# Altium PCB PCB1.pcbdoc (part 3 of 3)
Units mm, origin at the board's own origin, x right, y up, seen from the top; angles counter-clockwise.
Board outline 135 x 100 mm, 4 copper layers (Top Layer, GND, VCC, Bottom Layer), stack 1.757 mm thick; 175 components, 160 nets, 705 pads, 758 vias.
Unrouted connection lines stored in the file: 8.
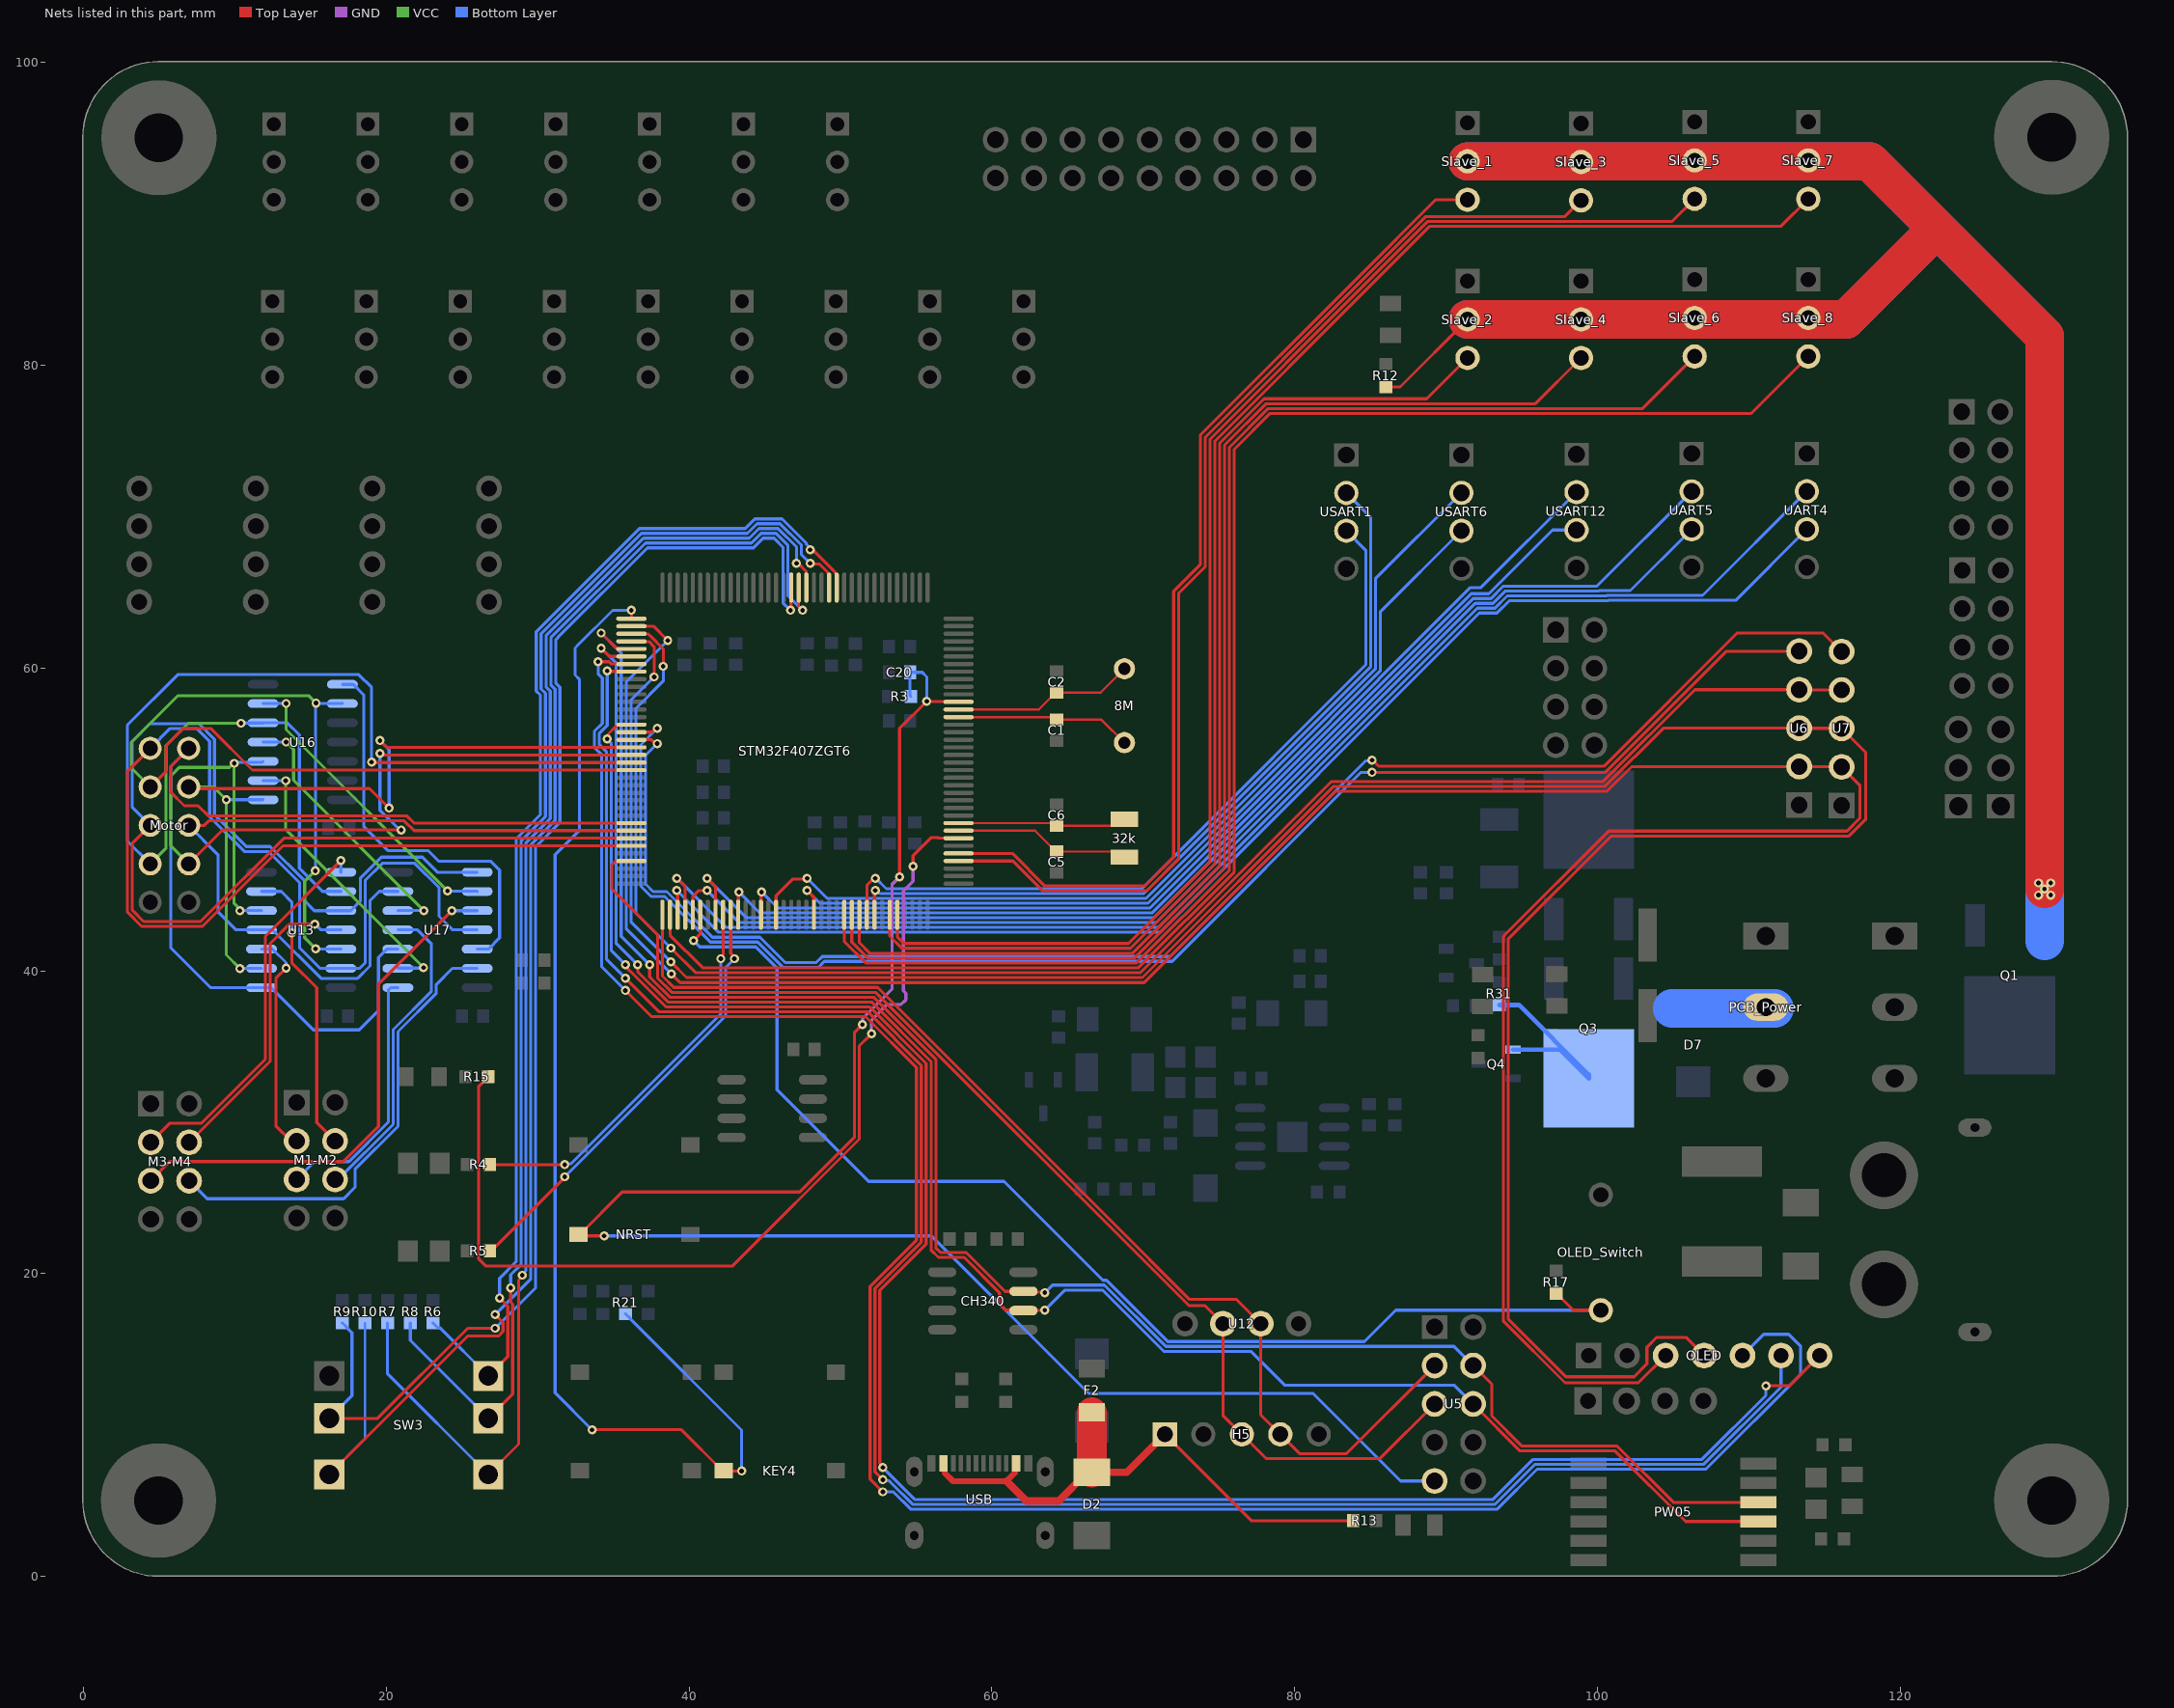
[diagram p5: the nets of this part, all layers, seen from the top]

## Via types
v1: diameter 0.6, hole 0.3, Top Layer to Bottom Layer, tented both sides, 722 vias
v2: diameter 0.6, hole 0.5, Top Layer to Bottom Layer, tented both sides, 24 vias
v3: diameter 0.6, hole 0.5, Top Layer to Bottom Layer, 8 vias
v4: diameter 0.61, hole 0.305, Top Layer to Bottom Layer, tented both sides, 4 vias

## Nets (pads, with @x,y where several pads share a name; then routed paths per layer and width w, separated by ;. In a path a pad name is that pad's centre, name@x,y a point inside that pad or via, vN(x,y) a via of type N, cw(c..) or ccw(c..) an arc to the next point about the centre after c; other vN are vias at no path point) (continued)
KEY4: KEY4.1 R21.1 STM32F407ZGT6.73 | length 83.3
  Top Layer w0.2: v1(33.6,9.7) 39.5,9.7 42.2,7 KEY4.1@42.299,7 42.324,6.975 v1(43.475,6.975) ; STM32F407ZGT6.73@36.2,63.25 v1(36.2,63.8)
  Bottom Layer w0.2: v1(33.6,9.7) 31.16,12.14 31.16,47.66 32.76,49.26 32.76,59.252 32.48,59.532 32.48,61.315 32.7,61.535 34.965,63.8 v1(36.2,63.8) ; R21.1@35.8,17.348 35.828,17.348 36.132,17.044 36.132,17.016 43.475,9.673 v1(43.475,6.975)
LED1: R4.2 STM32F407ZGT6.117 | length 26
  Top Layer w0.2: R4.2@26.852,27.2 v1(31.8,27.2) ; v1(42.1,40.8) 42.1,40.908 42.25,41.058 STM32F407ZGT6.117@42.25,43.7
  Bottom Layer w0.2: v1(31.8,27.2) 31.851,27.251 32.198,27.251 42.1,37.153 v1(42.1,40.8)
LED2: R5.2 STM32F407ZGT6.118 | length 29
  Top Layer w0.2: R5.2@26.952,21.5 26.952,21.528 27.256,21.832 27.284,21.832 31.8,26.348 v1(31.8,26.4) ; STM32F407ZGT6.118@42.751,43.7 42.751,41.158 43,40.908 v1(43,40.8)
  Bottom Layer w0.2: v1(31.8,26.4) 42.42,37.02 42.42,40.22 v1(43,40.8)
M1_Control: Motor.4 STM32F407ZGT6.90 U13.2 U16.1 | length 53.5
  Top Layer w0.2: Motor.4@6.97,52.14 7.08,52.03 18.91,52.03 v1(20.2,50.74) ; v1(19.6,55.2) 20.049,54.751 STM32F407ZGT6.90@36.2,54.751
  VCC w0.2: Motor.4@6.97,52.14 8.61,52.14 v1(9.45,51.3) 9.45,41.05 v1(10.35,40.15)
  Bottom Layer w0.2: v1(9.45,51.3) 9.455,51.295 11.876,51.295 U16.1@11.881,51.29 ; v1(10.35,40.15) 10.355,40.155 11.776,40.155 U13.2@11.781,40.16 ; v1(19.6,55.2) 20.2,54.6 v1(20.2,50.74)
M1_Control_R: U16.2 U17.2 | length 19.3
  VCC w0.2: v1(13.375,52.55) 13.375,49.325 22.475,40.225 v1(22.475,40.2)
  Bottom Layer w0.2: U16.2@11.881,52.56 13.24,52.56 13.25,52.55 v1(13.375,52.55) ; U17.2@20.781,40.16 20.801,40.18 22.455,40.18 v1(22.475,40.2)
M1_IN1: M1-M2.3 U13.3 | length 14.8
  Top Layer w0.2: v1(13.4,40.175) 12.725,39.5 12.725,29.761 13.726,28.76 M1-M2.3@14.1,28.76
  Bottom Layer w0.2: U13.3@11.781,41.43 12.513,41.43 13.4,40.543 v1(13.4,40.175)
M1_IN2: M1-M2.5 U17.1 | length 17
  Bottom Layer w0.2: M1-M2.5@14.1,26.22 15.28,27.4 17.55,27.4 20.15,30 20.15,38.717 20.323,38.89 U17.1@20.781,38.89
M1_PWM: Motor.2 STM32F407ZGT6.100 U13.1 U17.3 | length 69.8
  Top Layer w0.2: Motor.2@6.97,54.68 5.8,53.51 5.8,51.782 6.682,50.9 7.6,50.9 8.28,50.22 21.38,50.22 21.85,49.75 STM32F407ZGT6.100@36.2,49.75
  Bottom Layer w0.2: Motor.2@6.97,54.68 5.8,53.51 5.8,41.5 8.41,38.89 12.412,38.89 12.676,38.625 12.676,38.624 15.2,36.1 18.225,36.1 19.5,37.375 19.5,40.88 20.05,41.43 U17.3@20.781,41.43
M2_Control: Motor.8 STM32F407ZGT6.91 U13.5 U16.3 | length 61.4
  Top Layer w0.2: Motor.8@6.97,47.06 9.21,49.3 v1(21,49.3) ; v1(19.596,54.35) 19.705,54.35 19.803,54.251 STM32F407ZGT6.91@36.2,54.251
  VCC w0.2: Motor.8@6.97,47.06 5.8,48.23 5.8,52.875 6.35,53.425 9.658,53.425 9.933,53.7 v1(9.975,53.7) ; v1@9.973,53.698 9.97,53.695 9.97,44.444 10.35,44.064 v1(10.35,43.975)
  Bottom Layer w0.2: v1(9.975,53.7) 10.04,53.765 11.816,53.765 U16.3@11.881,53.83 ; v1(10.35,43.975) 10.352,43.973 11.779,43.973 U13.5@11.781,43.97 ; v1(19.596,54.35) 19.596,50.604 20.9,49.3 v1(21,49.3)
M2_Control_R: U16.4 U17.5 | length 18.1
  VCC w0.2: v1(13.4,55.1) 13.895,54.605 13.895,52.58 v1(22.5,43.975)
  Bottom Layer w0.2: U16.4@11.881,55.1 v1(13.4,55.1) ; U17.5@20.781,43.97 20.784,43.973 22.498,43.973 v1(22.5,43.975)
M2_IN1: M1-M2.4 U13.6 | length 19.3
  Top Layer w0.2: v1(13.775,42.5) 13.775,40.535 15.425,38.885 15.425,29.975 M1-M2.4@16.64,28.76
  Bottom Layer w0.2: U13.6@11.781,45.24 13.085,45.24 13.775,44.55 v1(13.775,42.5)
M2_IN2: M1-M2.6 U17.4 | length 20.9
  Bottom Layer w0.2: M1-M2.6@16.64,26.22 16.823,26.22 20.47,29.867 20.47,36.12 22.995,38.645 22.995,41.78 22.075,42.7 U17.4@20.781,42.7
M2_PWM: Motor.6 STM32F407ZGT6.101 U13.4 U17.6 | length 54.7
  Top Layer w0.2: Motor.6@6.97,49.6 8,49.6 8.3,49.9 21.2,49.9 21.848,49.252 STM32F407ZGT6.101@36.2,49.252
  Bottom Layer w0.2: Motor.6@6.97,49.6 8.9,47.67 8.9,43.9 10.1,42.7 U13.4@11.781,42.7 12.513,42.7 15.713,39.5 18.125,39.5 18.945,40.32 18.945,44.635 19.55,45.24 U17.6@20.781,45.24
M3_Control: Motor.7 STM32F407ZGT6.92 U13.9 U16.5 | length 79.9
  Top Layer w0.2: v1(19.045,53.77) 19.065,53.751 STM32F407ZGT6.92@36.2,53.751
  VCC w0.2: Motor.7@4.43,47.06 5.48,48.11 5.48,54.88 6.945,56.345 v1(10.431,56.345)
  Bottom Layer w0.2: Motor.7@4.43,47.06 2.925,48.565 2.925,56.225 6.25,59.55 18.2,59.55 19.045,58.705 v1(19.045,53.77) ; v1(10.431,56.345) 10.443,56.358 11.869,56.358 U16.5@11.881,56.37 13.48,56.37 14.275,55.575 14.275,46.775 15.81,45.24 U13.9@17.019,45.24
M3_Control_R: U16.6 U17.9 | length 20.3
  VCC w0.2: v1(13.4,57.65) 13.4,55.925 v1(24.05,45.275)
  Bottom Layer w0.2: U16.6@11.881,57.64 13.39,57.64 v1(13.4,57.65) ; v1(24.05,45.275) 24.067,45.258 26.001,45.258 U17.9@26.019,45.24
M3_IN1: M3-M4.3 U13.8 | length 25.8
  Top Layer w0.2: M3-M4.3@4.46,28.68 5.705,29.925 7.792,29.925 12.03,34.163 12.03,42.28 v1(17.025,47.275)
  Bottom Layer w0.2: U13.8@17.019,46.51 17.019,47.269 v1(17.025,47.275)
M3_IN2: M3-M4.5 U17.10 | length 34.5
  Top Layer w0.2: M3-M4.5@4.46,26.14 5.72,27.4 17.175,27.4 19.5,29.725 19.5,39.125 v1(24.35,43.975)
  Bottom Layer w0.2: v1(24.35,43.975) 24.355,43.97 U17.10@26.019,43.97
M3_PWM: Motor.5 STM32F407ZGT6.102 U13.10 U17.8 | length 82.5
  Top Layer w0.2: Motor.5@4.43,49.6 3.25,48.42 3.25,44 4,43.25 7.75,43.25 13.252,48.752 STM32F407ZGT6.102@36.2,48.752
  Bottom Layer w0.2: Motor.5@4.43,49.6 3.245,50.785 3.245,55.145 4.42,56.32 7.633,56.32 8.67,55.283 8.67,50.3 10.77,48.2 12.353,48.2 14.62,45.933 14.62,44.617 15.267,43.97 17.67,43.97 18.3,44.6 18.3,46.1 19.7,47.5 22.4,47.5 23.39,46.51 U17.8@26.019,46.51
M4_Control: Motor.3 STM32F407ZGT6.93 U13.12 U16.9 | length 72.9
  Top Layer w0.2: Motor.3@4.43,52.14 5.475,53.185 5.475,54.875 6.6,56 8.425,56 11.175,53.25 STM32F407ZGT6.93@36.2,53.25
  VCC w0.2: Motor.3@4.43,52.14 3.175,53.395 3.175,55.075 6.27,58.17 14.88,58.17 v1(15.375,57.675) ; v1(15.325,46.6) 14.625,45.9 14.625,42.175 v1(15.35,41.45)
  Bottom Layer w0.2: v1(15.325,46.6) 15.35,46.625 15.35,57.65 v1(15.375,57.675) 15.393,57.657 17.101,57.657 U16.9@17.119,57.64 ; v1(15.35,41.45) 15.36,41.44 17.009,41.44 U13.12@17.019,41.43
M4_Control_R: U16.8 U17.12 | length 26.8
  Bottom Layer w0.2: U16.8@17.119,58.91 17.84,58.91 18.525,58.225 18.525,49.55 20.15,47.925 22.8,47.925 23.5,47.225 26.925,47.225 27.5,46.65 27.5,42.175 26.755,41.43 U17.12@26.019,41.43
M4_IN1: M3-M4.4 U13.11 | length 20.7
  Top Layer w0.2: M3-M4.4@7,28.68 12.35,34.03 12.35,41.81 13.615,43.075 v1(15.3,43.075)
  Bottom Layer w0.2: v1(15.3,43.075) 15.325,43.075 15.7,42.7 U13.11@17.019,42.7
M4_IN2: M3-M4.6 U17.13 | length 30.5
  Bottom Layer w0.2: M3-M4.6@7,26.14 8.19,24.95 17.2,24.95 17.95,25.7 17.95,26.895 20.79,29.735 20.79,35.987 23.315,38.512 23.315,39.09 24.385,40.16 U17.13@26.019,40.16
M4_PWM: Motor.1 STM32F407ZGT6.103 U13.13 U17.11 | length 90.4
  Top Layer w0.2: Motor.1@4.43,54.68 2.93,53.18 2.93,43.867 3.867,42.93 7.883,42.93 13.204,48.252 STM32F407ZGT6.103@36.2,48.252
  Bottom Layer w0.2: Motor.1@4.43,54.68 5.75,56 7.5,56 8.35,55.15 8.35,50.167 10.642,47.875 12.225,47.875 14.3,45.8 14.3,41.5 15.64,40.16 U13.13@17.019,40.16 18.26,40.16 18.625,40.525 18.625,45.972 19.753,47.1 21.9,47.1 23.5,45.5 23.5,43.6 24.4,42.7 U17.11@26.019,42.7
NRST: C20.2 NRST.1 R3.1 STM32F407ZGT6.25 U5.9 | length 121.5
  Top Layer w0.2: v1(34.4,22.5) 32.799,22.5 NRST.1@32.699,22.6 32.798,22.6 35.598,25.4 47.3,25.4 50.9,29 50.9,29.012 50.92,29.032 50.92,35.92 v1(51.451,36.451) ; v1(53.9,46.2) 53.9,56 v1(55.7,57.8) 55.734,57.766 57.785,57.766 STM32F407ZGT6.25@57.8,57.751
  GND w0.2: v1(51.451,36.451) 51.471,36.471 51.471,36.879 53.42,38.827 53.42,45.72 v1(53.9,46.2)
  Bottom Layer w0.2: v1(34.4,22.5) 56,22.5 66.4,12.1 81.2,12.1 86.98,6.32 U5.9@89.23,6.32 ; R3.1@54.654,58.1 54.6,58.154 C20.2@54.6,59.7 55.4,59.7 55.7,59.4 v1(55.7,57.8)
OCS32_IN: 32k.2 C5.2 STM32F407ZGT6.8 | length 11.7
  Top Layer w0.15: STM32F407ZGT6.8@57.8,49.252 62.847,49.252 64.225,47.874 C5.2@64.275,47.874 68.377,47.874 32k.2@68.75,47.5
OCS32_OUT: 32k.1 C6.2 STM32F407ZGT6.9 | length 11.2
  Top Layer w0.15: STM32F407ZGT6.9@57.8,49.75 64.101,49.75 C6.2@64.275,49.577 68.327,49.577 32k.1@68.75,50
OCS_IN: 8M.2 C1.2 STM32F407ZGT6.23 | length 11.6
  Top Layer w0.15: STM32F407ZGT6.23@57.8,56.75 64.098,56.75 C1.2@64.275,56.573 67.238,56.573 8M.2@68.75,55.062
OCS_OUT: 8M.1 C2.2 STM32F407ZGT6.24 | length 12.1
  Top Layer w0.15: STM32F407ZGT6.24@57.8,57.251 63.1,57.251 64.225,58.376 C2.2@64.275,58.376 67.186,58.376 8M.1@68.75,59.941
OLED_DC: OLED.6 STM32F407ZGT6.80 | length 138.9
  Top Layer w0.2: v1(34.6,59.8) 34.635,59.765 36.185,59.765 STM32F407ZGT6.80@36.2,59.75 ; v1(35.8,39.5) 38,37.3 51.79,37.3 55.34,33.75 55.34,22.091 52.28,19.031 52.28,6.92 v1(52.8,6.4)
  Bottom Layer w0.2: v1(34.6,59.8) 34.6,56.2 34.08,55.68 34.08,54.92 34.56,54.44 34.56,40.74 v1(35.8,39.5) ; v1(52.8,6.4) 52.877,6.323 53.224,6.323 53.35,6.197 54.768,4.78 93.227,4.78 95.867,7.42 107.007,7.42 112.1,12.513 OLED.6@112.1,14.6
OLED_RES: OLED.5 STM32F407ZGT6.79 | length 147.4
  Top Layer w0.2: v1(34,60.4) 34.735,60.4 34.885,60.251 STM32F407ZGT6.79@36.2,60.251 ; v1(35.8,38.7) 37.52,36.98 51.657,36.98 55.02,33.617 55.02,22.223 51.96,19.163 51.96,6.44 v1(52.8,5.6)
  Bottom Layer w0.2: v1(34,60.4) 34,59.6 34.28,59.32 34.28,56.333 33.76,55.813 33.76,54.731 34.24,54.251 34.24,40.26 v1(35.8,38.7) ; v1(52.8,5.6) 53.495,5.6 54.635,4.46 54.84,4.46 93.36,4.46 96,7.1 107.14,7.1 113.4,13.36 113.4,15.2 112.6,16 110.96,16 OLED.5@109.56,14.6
OLED_Select: OLED_Switch.2 R17.2 STM32F407ZGT6.114 | length 81.7
  Top Layer w0.2: v1(40.3,42) 40.749,42.449 STM32F407ZGT6.114@40.749,43.7 ; R17.2@97.25,18.696 97.278,18.696 98.384,17.59 OLED_Switch.2@100.2,17.59
  Bottom Layer w0.2: v1(40.3,42) 40.72,41.58 44.415,41.58 45.812,40.183 45.812,32.153 51.865,26.1 60.8,26.1 67.33,19.57 67.56,19.57 71.61,15.52 84.597,15.52 86.667,17.59 OLED_Switch.2@100.2,17.59
PA13_SWDIO: H5.3 STM32F407ZGT6.105 U5.5 U12.2 | length 79.6
  Top Layer w0.2: STM32F407ZGT6.105@36.2,47.251 36.185,47.236 35.136,47.236 34.9,47 34.9,45.4 37.93,42.37 37.93,39.518 38.867,38.58 52.32,38.58 73,17.9 74.05,17.9 U12.2@75.25,16.7 75.25,10.65 H5.3@76.5,9.4 78.095,7.805 85.635,7.805 U5.5@89.23,11.4
PA14_SWCLK: H5.4 STM32F407ZGT6.109 U5.3 U12.3 | length 74
  Top Layer w0.2: STM32F407ZGT6.109@38.25,43.7 38.25,39.65 39,38.9 52.453,38.9 67.753,23.6 73.053,18.3 76.15,18.3 U12.3@77.75,16.7 77.75,10.69 H5.4@79.04,9.4 80.315,8.125 83.415,8.125 U5.3@89.23,13.94
PC13: R15.2 STM32F407ZGT6.7 | length 65.5
  Top Layer w0.2: R15.2@26.752,33 26.752,32.972 26.448,32.668 26.42,32.668 26.1,32.348 26.1,21 26.6,20.5 42.853,20.5 51.24,28.887 51.24,35.04 v1(52.051,35.851) ; v1(54.8,46.9) 54.8,47.605 56,48.805 56.431,48.805 56.483,48.752 STM32F407ZGT6.7@57.8,48.752
  GND w0.2: v1(52.051,35.851) 52.051,36.751 53.08,37.78 54.015,37.78 54.32,38.085 54.32,38.515 54.155,38.68 54.155,45.267 54.8,45.912 v1(54.8,46.9)
Pow_IN: D7.1 PCB_Power.2 Q3.2 Q4.1 R31.2 | length 20.6
  Bottom Layer w0.3: R31.2@93.5,37.746 94.805,37.746 99.4,33.15 Q3.2@99.4,32.9 97.5,34.8 Q4.1@94.4,34.8
  Bottom Layer w2.54: 104.9,37.513 D7.1@106.3,37.513 PCB_Power.2@111.687,37.513
Rocker_Down: R7.1 STM32F407ZGT6.53 SW3.6 | length 92.9
  Top Layer w0.2: SW3.6@26.75,6.749 28.752,8.751 28.752,19.583 29,19.831 v1(29,19.9) ; v1(47.1,66.9) 47.208,66.9 47.734,66.374 47.734,65.315 STM32F407ZGT6.53@47.749,65.3
  Bottom Layer w0.2: R7.1@20.1,16.746 20.1,13.399 SW3.6@26.75,6.749 ; v1(29,19.9) 29,19.977 29.24,20.217 29.24,21.9 29.24,48.455 30.84,50.055 30.84,58.457 30.56,58.737 30.56,62.123 36.997,68.56 43.984,68.56 44.62,69.196 45.883,69.196 47.1,67.979 v1(47.1,66.9)
Rocker_Enter: R10.1 STM32F407ZGT6.54 SW3.3 | length 99.3
  Top Layer w0.15: STM32F407ZGT6.54@47.249,65.3 47.249,64.096 47.5,63.845 v1(47.5,63.8)
  Top Layer w0.2: SW3.3@16.25,6.749 25.381,15.88 27.415,15.88 27.72,16.185 27.72,16.78 v1(27.2,17.3)
  Bottom Layer w0.15: SW3.3@16.25,6.749 18.6,9.099 R10.1@18.6,16.746
  Bottom Layer w0.2: v1(27.2,17.3) 29.56,19.66 29.56,48.322 31.16,49.922 31.16,58.589 30.88,58.869 30.88,61.99 37.13,68.24 44.117,68.24 44.753,68.876 45.75,68.876 46.52,68.106 46.52,64.78 v1(47.5,63.8)
Rocker_Left: R9.1 STM32F407ZGT6.55 SW3.2 | length 91.9
  Top Layer w0.2: SW3.2@16.25,10.45 19.45,10.45 25.4,16.4 v1(27.2,16.4) ; v1(46.7,63.8) 46.736,63.836 46.736,65.285 STM32F407ZGT6.55@46.751,65.3
  Bottom Layer w0.2: SW3.2@16.25,10.45 17.75,11.95 17.75,16.096 17.432,16.414 17.432,16.442 17.128,16.746 R9.1@17.1,16.746 ; v1@27.209,16.4 29.88,19.071 29.88,48.19 31.48,49.79 31.48,58.722 31.2,59.002 31.2,61.846 31.36,62.006 31.36,62.018 37.262,67.92 44.249,67.92 44.885,68.556 45.617,68.556 46.2,67.974 46.2,64.3 v1(46.7,63.8)
Rocker_Right: R8.1 STM32F407ZGT6.50 SW3.5 | length 86.7
  Top Layer w0.2: SW3.5@26.75,10.45 28.36,12.059 28.36,17.993 28.232,18.12 v1(28.232,19.068) ; v1(48,66.9) 48.039,66.861 48.6,66.861 49.14,66.321 49.14,66.292 49.25,66.181 STM32F407ZGT6.50@49.25,65.3
  Bottom Layer w0.2: R8.1@21.6,16.746 21.6,15.6 SW3.5@26.75,10.45 ; v1(28.232,19.068) 28.232,19.932 28.92,20.62 28.92,21.9 28.92,48.588 30.52,50.188 30.52,58.324 30.24,58.604 30.24,62.255 36.865,68.88 43.852,68.88 44.488,69.516 46.015,69.516 47.42,68.111 47.42,67.48 v1(48,66.9)
Rocker_UP: R6.1 STM32F407ZGT6.49 SW3.4 | length 81.7
  Top Layer w0.2: SW3.4@26.75,13.249 28.04,14.538 28.04,17.86 v1(27.5,18.4) ; v1(48,67.8) 48.077,67.723 48.238,67.723 49.64,66.321 49.64,66.292 49.751,66.181 STM32F407ZGT6.49@49.751,65.3
  Bottom Layer w0.2: R6.1@23.1,16.746 23.404,16.442 23.557,16.442 SW3.4@26.75,13.249 ; v1(27.5,18.4) 27.5,19.7 28.6,20.8 28.6,48.72 30.2,50.32 30.2,58.192 29.92,58.472 29.92,62.388 36.732,69.2 43.719,69.2 44.355,69.836 46.148,69.836 47.74,68.244 47.74,68.168 48,67.908 v1(48,67.8)
S_Pow: Q1.3 R12.2 Slave_1.2 Slave_2.2 Slave_3.2 Slave_4.2 Slave_5.2 Slave_6.2 Slave_7.2 Slave_8.2 | length 236.1
  Top Layer w0.2: R12.2@85.9,78.548 86.948,78.548 Slave_2.2@91.4,83
  Top Layer w2.54: Slave_2.2@91.4,83 Slave_4.2@98.9,83 106.4,83 113.9,83 116.4,83 122.25,88.85 ; Slave_1.2@91.4,93.44 98.9,93.44 106.4,93.44 113.9,93.44 117.96,93.44 122.4,89 129.5,81.9 129.5,45.8 v1(129.5,45.4)
  Bottom Layer w2.54: Slave_2.2@91.4,83 Slave_4.2@98.9,83 116.4,83 122.25,88.85 ; Slave_1.2@91.4,93.44 117.96,93.44 129.5,81.9 v1(129.5,45.4) Q1.3@129.5,41.97
  other v1: 129.1,45 129.9,45 129.1,45.8 129.9,45.8
Slave1: Slave_1.3 STM32F407ZGT6.5 | length 68.5
  Top Layer w0.2: STM32F407ZGT6.5@57.8,47.751 61.349,47.751 63.5,45.6 70.1,45.6 72,47.5 72,65.048 73.76,66.808 73.76,75.36 84.159,85.759 89.3,90.9 Slave_1.3@91.4,90.9
Slave2: Slave_3.3 STM32F407ZGT6.4 | length 76.1
  Top Layer w0.2: STM32F407ZGT6.4@57.8,47.251 61.397,47.251 63.367,45.28 70.233,45.28 72.32,47.367 72.32,64.915 74.08,66.675 74.08,75.227 84.292,85.439 88.653,89.8 97.84,89.8 Slave_3.3@98.9,90.86
Slave3: Slave_5.3 STM32F407ZGT6.140 | length 91
  Top Layer w0.2: STM32F407ZGT6.140@53.751,43.7 53.751,42.249 54.2,41.8 69.015,41.8 74.4,47.185 74.4,75.095 84.424,85.119 88.785,89.48 104.92,89.48 Slave_5.3@106.4,90.96
Slave4: Slave_7.3 STM32F407ZGT6.139 | length 99.2
  Top Layer w0.2: STM32F407ZGT6.139@53.251,43.7 53.251,42.297 54.067,41.48 69.148,41.48 74.72,47.052 74.72,74.962 84.557,84.799 88.918,89.16 112.1,89.16 Slave_7.3@113.9,90.96
Slave5: Slave_2.3 STM32F407ZGT6.135 | length 74.9
  Top Layer w0.2: STM32F407ZGT6.135@51.249,43.7 51.249,41.851 51.94,41.16 69.28,41.16 75.04,46.92 75.04,74.83 77.971,77.761 88.701,77.761 Slave_2.3@91.4,80.46
Slave6: Slave_4.3 STM32F407ZGT6.134 | length 83.2
  Top Layer w0.2: STM32F407ZGT6.134@50.749,43.7 50.749,41.898 51.807,40.84 69.413,40.84 74.88,46.307 75.36,46.787 75.36,74.697 78.104,77.441 95.881,77.441 Slave_4.3@98.9,80.46
Slave7: Slave_6.3 STM32F407ZGT6.133 | length 91.4
  Top Layer w0.2: STM32F407ZGT6.133@50.251,43.7 50.251,41.944 51.675,40.52 69.545,40.52 75.68,46.655 75.68,74.565 78.236,77.121 102.961,77.121 Slave_6.3@106.4,80.56
Slave8: Slave_8.3 STM32F407ZGT6.110 | length 110.5
  Top Layer w0.2: STM32F407ZGT6.110@38.75,43.7 38.75,42.35 40.9,40.2 69.678,40.2 76,46.522 76,74.432 78.369,76.801 110.141,76.801 Slave_8.3@113.9,80.56
SPI_CS1: OLED.7 STM32F407ZGT6.87 | length 135.2
  Top Layer w0.2: v1(34.6,55.3) 34.677,55.377 34.677,55.64 35.179,56.142 35.211,56.142 35.319,56.25 STM32F407ZGT6.87@36.2,56.25 ; v1(35.8,40.4) 35.8,40.292 35.969,40.123 35.969,40.121 36.304,39.786 38.47,37.62 51.922,37.62 55.66,33.882 55.66,21.958 52.6,18.898 52.6,7.517 52.6,7.508 52.8,7.308 v1(52.8,7.2) ; v1(111.1,12.6) 112.64,12.6 OLED.7@114.64,14.6
  Bottom Layer w0.2: v1(34.6,55.3) 34.6,55.263 34.88,54.983 34.88,41.32 v1(35.8,40.4) ; v1(52.8,7.2) 54.9,5.1 93.095,5.1 95.735,7.74 106.875,7.74 111.1,11.965 v1(111.1,12.6)
SPI_CS2: STM32F407ZGT6.88 U6.5 | length 100
  Top Layer w0.2: STM32F407ZGT6.88@36.2,55.752 37.544,55.752 37.792,56 v1(37.9,56) ; v1(85.1,53.1) 100.5,53.1 108.5,61.1 U6.5@113.3,61.1
  Bottom Layer w0.2: v1(37.9,56) 36.812,54.912 36.812,45.599 37.502,44.91 38.402,44.91 41.412,41.9 44.547,41.9 46.227,40.22 48.533,40.22 48.933,40.62 71.894,40.62 84.374,53.1 v1(85.1,53.1)
SPI_CS3: STM32F407ZGT6.89 U7.5 | length 102.4
  Top Layer w0.2: STM32F407ZGT6.89@36.2,55.252 37.54,55.252 37.792,55 v1(37.9,55) ; v1(85.1,53.9) 85.149,53.9 85.549,53.5 100.4,53.5 109.2,62.3 114.88,62.3 U7.5@116.1,61.08
  Bottom Layer w0.2: v1(37.9,55) 37.132,54.232 37.132,45.732 37.634,45.23 38.535,45.23 41.545,42.22 44.68,42.22 46.36,40.54 48.4,40.54 48.8,40.94 71.761,40.94 84.686,53.865 85.065,53.865 v1(85.1,53.9)
SPI_MISO: STM32F407ZGT6.75 U6.4 U7.4 | length 109.7
  Top Layer w0.2: STM32F407ZGT6.75@36.2,62.252 36.215,62.237 37.316,62.237 37.496,62.057 38.3,61.253 v1(38.3,60.1) ; v1(38.8,41.5) 40.42,39.88 69.811,39.88 82.431,52.5 100.353,52.5 106.413,58.56 U6.4@113.3,58.56 113.31,58.55 116.09,58.55 U7.4@116.1,58.54
  Bottom Layer w0.2: v1(38.3,60.1) 38.3,59.13 36.492,57.322 36.492,43.808 v1(38.8,41.5)
SPI_MOSI: OLED.4 STM32F407ZGT6.76 U6.3 U7.3 | length 184.1
  Top Layer w0.2: STM32F407ZGT6.76@36.2,61.752 36.215,61.737 37.363,61.737 37.7,61.4 v1(37.7,59.4) ; v1(38.8,40.6) 39.84,39.56 69.943,39.56 82.563,52.18 100.485,52.18 104.325,56.02 U6.3@113.3,56.02 113.31,56.01 116.09,56.01 U7.3@116.1,56 117.7,54.4 117.7,50.015 116.585,48.9 100.9,48.9 94.08,42.08 94.08,17.02 97.9,13.2 102.4,13.2 103.248,14.048 103.248,15.148 103.9,15.8 105.82,15.8 OLED.4@107.02,14.6
  Bottom Layer w0.2: v1(37.7,59.4) 36.172,57.872 36.172,43.228 v1(38.8,40.6)
SPI_SCK: OLED.3 STM32F407ZGT6.74 U6.2 U7.2 | length 179.8
  Top Layer w0.2: STM32F407ZGT6.74@36.2,62.75 37.65,62.75 v1(38.6,61.8) ; v1(38.835,39.801) 39.415,39.22 70.056,39.22 82.696,51.86 100.618,51.86 102.238,53.48 U6.2@113.3,53.48 113.31,53.47 116.09,53.47 U7.2@116.1,53.46 117.3,52.26 117.3,50.067 116.453,49.22 100.767,49.22 100.747,49.2 100.7,49.2 93.8,42.3 93.8,42.253 93.76,42.213 93.76,16.887 97.847,12.8 102.68,12.8 OLED.3@104.48,14.6
  Bottom Layer w0.2: v1(38.6,61.8) 35.852,59.052 35.852,42.783 v1(38.835,39.801)
UART1_RX: STM32F407ZGT6.137 USART1.2 | length 52.8
  Top Layer w0.2: STM32F407ZGT6.137@52.25,43.7 52.25,45.25 v1(52.3,45.3)
  Bottom Layer w0.2: v1(52.3,45.3) 52.408,45.3 52.608,45.1 70.038,45.1 72.915,47.977 85,60.062 85,69.95 USART1.2@83.4,71.55
UART1_TX: STM32F407ZGT6.136 USART1.3 | length 50.9
  Top Layer w0.2: STM32F407ZGT6.136@51.75,43.7 51.75,45.66 51.891,45.802 51.893,45.802 52.192,46.1 v1(52.3,46.1)
  Bottom Layer w0.2: v1(52.3,46.1) 52.349,46.1 53.029,45.42 69.905,45.42 72.568,48.083 84.68,60.195 84.68,67.77 USART1.3@83.4,69.05
UART2_RX: STM32F407ZGT6.122 USART12.2 | length 67.1
  Top Layer w0.2: STM32F407ZGT6.122@44.75,43.7 44.765,43.715 44.765,45.165 v1(44.8,45.2)
  Bottom Layer w0.2: v1(44.8,45.2) 45.86,44.14 70.436,44.14 79.473,53.177 91.596,65.3 92.298,65.3 USART12.2@98.6,71.602
UART2_TX: STM32F407ZGT6.119 USART12.3 | length 67.9
  Top Layer w0.2: STM32F407ZGT6.119@43.251,43.7 43.266,43.715 43.266,45.166 v1(43.3,45.2)
  Bottom Layer w0.2: v1(43.3,45.2) 44.68,43.82 70.568,43.82 91.648,64.9 92.816,64.9 97.016,69.1 USART12.3@98.6,69.1
UART3_RX: CH340.6 PW05.3 STM32F407ZGT6.78 U5.6 | length 122.5
  Top Layer w0.2: v1(34.2,61.3) 34.749,60.751 STM32F407ZGT6.78@36.2,60.751 ; v1(36.6,40.4) 36.624,40.376 36.624,39.918 38.602,37.94 52.055,37.94 55.98,34.015 55.98,21.567 56.467,21.08 58.167,21.08 60.5,18.747 60.5,18 60.9,17.6 62.047,17.6 CH340.6@62.082,17.565 62.1,17.583 63.483,17.583 v1(63.5,17.6) ; U5.6@91.77,11.4 94.87,8.3 101.15,8.3 105.81,3.64 PW05.3@110.6,3.64
  Bottom Layer w0.2: v1(34.2,61.3) 35.2,60.3 35.2,41.8 v1(36.6,40.4) ; v1(63.5,17.6) 64.825,18.925 67.3,18.925 71.345,14.88 77.095,14.88 79.344,12.631 90.539,12.631 U5.6@91.77,11.4
UART3_TX: CH340.7 PW05.4 STM32F407ZGT6.77 U5.4 | length 123
  Top Layer w0.2: v1(34.2,62.3) 35.233,61.267 36.185,61.267 STM32F407ZGT6.77@36.2,61.251 ; v1(37.4,40.4) 37.4,39.6 37.61,39.39 37.61,39.385 38.735,38.26 52.187,38.26 56.3,34.147 56.3,21.7 56.6,21.4 58.3,21.4 60.865,18.835 CH340.7@62.082,18.835 62.125,18.793 63.457,18.793 v1(63.5,18.75) ; U5.4@91.77,13.94 93,12.71 93,10.623 95.003,8.62 101.283,8.62 104.993,4.91 PW05.4@110.6,4.91
  Bottom Layer w0.2: v1(34.2,62.3) 35.52,60.98 35.52,42.28 v1(37.4,40.4) ; v1(63.5,18.75) 64,19.25 67.428,19.25 71.478,15.2 90.51,15.2 U5.4@91.77,13.94
UART4_RX: STM32F407ZGT6.112 UART4.2 | length 90.5
  Top Layer w0.2: v1(39.2,46.1) 39.751,45.549 STM32F407ZGT6.112@39.751,43.7
  Bottom Layer w0.2: v1@39.212,46.1 42.452,42.86 70.966,42.86 92.046,63.94 93.213,63.94 94.027,64.753 100.573,64.753 100.6,64.78 106.928,64.78 UART4.2@113.8,71.652
UART4_TX: STM32F407ZGT6.111 UART4.3 | length 88.4
  Top Layer w0.2: v1(39.2,45.3) 39.25,45.25 STM32F407ZGT6.111@39.25,43.7
  Bottom Layer w0.2: v1(39.2,45.3) 41.96,42.54 71.098,42.54 92.178,63.62 93.346,63.62 94.159,64.433 100.706,64.433 100.733,64.46 109.11,64.46 UART4.3@113.8,69.15
UART5_RX: STM32F407ZGT6.116 UART5.2 | length 80.4
  Top Layer w0.2: v1(41.2,46.1) 41.75,45.55 STM32F407ZGT6.116@41.75,43.7
  Bottom Layer w0.2: v1(41.2,46.1) 43.8,43.5 70.701,43.5 91.781,64.58 92.948,64.58 93.768,65.4 99.95,65.4 UART5.2@106.2,71.65
UART5_TX: STM32F407ZGT6.113 UART5.3 | length 78.9
  Top Layer w0.2: STM32F407ZGT6.113@40.251,43.7 40.251,44.895 40.657,45.3 v1(41.2,45.3)
  Bottom Layer w0.2: v1(41.2,45.3) 43.32,43.18 70.833,43.18 91.913,64.26 93.081,64.26 93.901,65.08 100.083,65.08 100.103,65.1 102.15,65.1 UART5.3@106.2,69.15
UART6_RX: STM32F407ZGT6.124 USART6.2 | length 62.1
  Top Layer w0.2: STM32F407ZGT6.124@45.75,43.7 45.75,44.95 46.86,46.06 47.76,46.06 v1(47.8,46.1)
  Bottom Layer w0.2: v1(47.8,46.1) 49.12,44.78 70.17,44.78 85.32,59.93 85.32,65.872 USART6.2@91,71.552
UART6_TX: STM32F407ZGT6.129 USART6.3 | length 57.8
  Top Layer w0.2: v1(47.8,45.3) 48.234,44.866 48.234,43.715 STM32F407ZGT6.129@48.25,43.7
  Bottom Layer w0.2: v1(47.8,45.3) 48.64,44.46 70.303,44.46 79.153,53.31 85.64,59.797 85.64,63.69 USART6.3@91,69.05
VBUS: D2.1 F2.1 H5.1 R13.2 USB.A4B9 USB.B4A9 | length 38
  Top Layer w0.2: H5.1@71.42,9.4 77.12,3.7 R13.2@83.848,3.7
  Top Layer w0.4: USB.A4B9@56.802,7.475 56.878,7.399 56.878,6.852 57.425,6.305 60.975,6.305 61.525,6.855 61.525,7.399 USB.B4A9@61.6,7.475 ; D2.1@66.3,6.89 D2.1@66.6,6.89
  Top Layer w0.5: 60.975,6.305 62.28,5 64.41,5 D2.1@66.3,6.89 ; D2.1@66.6,6.89 68.91,6.89 H5.1@71.42,9.4
  Top Layer w2: D2.1@66.6,6.89 F2.1@66.6,10.855
pads on no net: CH340.4 Designator7.17 PCB_Power.1 PW05.1 PW05.9 PW05.10 PW05.11 PW05.12 Slave_Power.1 STM32F407ZGT6.3 STM32F407ZGT6.20 STM32F407ZGT6.21 STM32F407ZGT6.22 STM32F407ZGT6.104 STM32F407ZGT6.115 STM32F407ZGT6.123 STM32F407ZGT6.132 U5.10 U16.10 U16.11 U16.12 U16.13 USB.A8 USB.B8 XT60.3 XT60.4

## Polygon pours and split planes (outlines as drawn)
GND on GND "NONET_L-01_P-001" (solid, remove dead copper, pour order 6): 4.977,100.028 0.028,100.028 0,100 0,0 135,0 135,77.5 82.5,77.5 81,76 81,68.25 81.5,67.75 81.5,41.5 77.25,41.5 72.3,46.45 72.3,60.2 69.5,63 67.2,63 62.2,58 55.75,58 55.75,62.25 54,64 52,64 50,66 50,69.25 51.75,71 55.75,71 64,79.25 64,83.25 56.5,90.75 56.5,97.5 54,100
GND on GND "NONET_L-01_P-001" (solid, remove dead copper, pour order 8): 58,97.1 82.1,97.1 85.1,94.1 85.1,81.2 80.379,76.479 80.379,67.821 81,67.2 81,39.4 80.4,38.8 78.5,38.8 77.7,39.6 77.7,41.9 72.9,46.7 72.9,60.5 69.8,63.6 66.7,63.6 61.6,58.5 56.2,58.5 56.2,62.651 54.361,64.49 52.51,64.49 50.5,66.5 50.5,68.8 52.142,70.442 56.239,70.442 64.5,78.704 64.5,83.7 57,91.2 57,96.2
3V3D on VCC "NONET_L-01_P-001" (solid, remove dead copper, pour order 10): 110,12.5 110,0 10,0 10,7.5 7.5,10 0,10 0,80 64,80 64,79.25 55.75,71 51.75,71 50,69.25 50,66 52,64 54,64 55.75,62.25 55.75,58 62.2,58 67.2,63 69.5,63 72.3,60.2 72.3,49.2 80.5,41 80.5,39.5 82,38 86.5,38 87.5,39 110,39
3V3A on VCC "NONET_L-01_P-001" (solid, remove dead copper, pour order 0): 58,97.1 82.1,97.1 85.1,94.1 85.1,81.2 80.379,76.479 80.379,67.821 82.1,66.1 82.1,49 87.1,44 87.1,39.5 86.1,38.5 82.5,38.5 81,40 81,41.401 72.9,49.501 72.9,60.5 69.8,63.6 66.7,63.6 61.6,58.5 56.2,58.5 56.2,62.651 54.361,64.49 52.51,64.49 50.5,66.5 50.5,68.8 51.8,70.1 56.1,70.1 64.5,78.5 64.5,83.7 57,91.2 57,96.2
GND on Top Layer "NONET_L-01_P-001" (solid, remove dead copper, pour order 5): 4.977,100.028 0.028,100.028 0,100 0,0 135,0 135,77.5 85.25,77.5 85.25,87.5 70.9,72.952 70.9,66.7 62.2,58 55.75,58 55.75,62.25 54,64 52,64 50,66 50,69.25 51.75,71 55.75,71 64,79.25 64,83.25 56.5,90.75 56.5,97.5 54,100
GND on Top Layer "NONET_L-01_P-001" (solid, remove dead copper, pour order 1): 58,97.1 82.1,97.1 85.1,94.1 85.1,89.1 70.2,74.2 70.2,67.1 66.7,63.6 61.6,58.5 56.75,58.5 56.75,63 55.5,64.25 52.75,64.25 50.5,66.5 50.5,68.8 52.142,70.442 56.239,70.442 64.5,78.704 64.5,83.7 57,91.2 57,96.2
GND on Bottom Layer "NONET_L-01_P-001" (solid, remove dead copper, pour order 7): 4.977,100.028 0.028,100.028 0,100 0,0 135,0 135,77.5 81.6,77.5 67.3,63.1 62.2,58 55.75,58 55.75,62.25 54,64 52,64 50,66 50,69.25 51.75,71 55.75,71 64,79.25 64,83.25 56.5,90.75 56.5,97.5 54,100
GND on Bottom Layer "NONET_L-01_P-001" (solid, remove dead copper, pour order 9): 58,97.1 82.1,97.1 85.1,94.1 85.1,82 66.7,63.6 61.6,58.5 56.2,58.5 56.2,62.651 54.361,64.49 52.51,64.49 50.5,66.5 50.5,68.8 52.142,70.442 56.239,70.442 64.5,78.704 64.5,83.7 57,91.2 57,96.2

## Other copper
Top Layer:
  pour cut-out: 135,100 87.5,100 87.5,77.5 117.5,77.5 120,80 127.5,80 127.5,47.5 107.25,47.5 102.5,42.75 102.5,27.5 102.5,20 110,12.5 135,12.5
  region net GND: 119.972,29.1 117.5,29.1 114,25.6 112.2,25.6 112.2,23.8 119.9,23.8 121.5,25.4 121.5,27.631
  region net 3V3A: 56.889,61.882 56.89,61.881 56.89,61.121 58.71,61.121 58.711,61.121 58.711,61.882 58.71,61.882
  region net $1N48: 105.5,26.4 105.5,28.5 109,32 109,33.5 110.1,34.6 120.5,34.6 121.5,33.6 121.5,32 120.5,31 115.5,31 110.9,26.4
  region net $1N49: 121.4,20.9 120.4,21.9 105.401,21.9 105.299,21.799 105.299,18.001 106.4,16.9 109.8,16.9 120.4,16.9 121.4,17.9
  pour cut-out: 98.2,0.6 111.8,0.6 111.8,-4.7 98.2,-4.7
GND:
  pour cut-out: 135,100 87.5,100 87.5,77.5 117.5,77.5 120,80 127.5,80 127.5,47.5 107.25,47.5 102.5,42.75 102.5,27.5 102.5,20 110,12.5 135,12.5
  pour cut-out: 98.2,0.6 111.8,0.6 111.8,-4.7 98.2,-4.7
VCC:
  pour cut-out: 135,100 87.5,100 87.5,77.5 117.5,77.5 120,80 127.5,80 127.5,47.5 107.25,47.5 102.5,42.75 102.5,27.5 102.5,20 110,12.5 135,12.5
  pour cut-out: 95.7,50.5 91.3,50.5 91.3,45.7 95.7,45.7
  region net $1N49: 121.4,20.9 120.4,21.9 117.6,21.9 115,19.3 106,19.3 105.4,18.7 105.4,17.9 106.4,16.9 120.4,16.9 121.4,17.9
  pour cut-out: 98.2,0.6 111.8,0.6 111.8,-4.7 98.2,-4.7
Bottom Layer:
  pour cut-out: 135,100 87.5,100 87.5,77.5 117.5,77.5 120,80 127.5,80 127.5,47.5 107.25,47.5 102.5,42.75 102.5,27.5 102.5,20 110,12.5 135,12.5
  region net $1N515: 92.267,50.756 92.25,50.739 92.25,49.25 94.75,49.25 94.775,49.275 96.4,47.65 96.4,47.2 96.85,46.75 102.4,46.75 102.4,53.225 94.889,53.225 94.406,52.742 94.406,52.052 93.104,50.75 92.975,50.75
  region net GND: 80.7,41.45 80.7,38.85 78.9,38.85 78.025,39.725 78.025,40.675 78.8,41.45
  region net 3V3A: 80.65,38.05 81.3,38.7 81.3,41.45 83.225,41.45 83.975,40.7 83.975,39.5 82.125,37.65 82.125,36.35 80.65,36.35
  region net 3V3D: 75.85,37.5 76.6,37.5 77.475,36.625 77.475,36.35 78.95,36.35 78.95,38.075 77.325,38.075 76.125,39.275 65,39.275 65,37.925 65.3,37.625 67.075,37.625 67.6,38.15 75.2,38.15
  region net 3V3D: 63.95,36.65 63.7,36.9 63.7,39 63.975,39.275 65.225,39.275 65.5,39 65.5,38.2 66.4,37.3
  region net 3V3D: 64.1,33.3 65.65,33.3 65.65,32.2 65.5,32.05 65.25,32.3 64.1,32.3
  region net 3V3D: 63.95,37.4 64.15,37.6 67.025,37.6 67.05,37.625 67.05,36 67,35.95 67,32.05 65.5,32.05 65.5,35.65 64.525,36.625 63.975,36.625 63.95,36.65
  region net GND: 69.95,26.025 70.75,26.025 70.75,25.975 70.75,26.025 71.65,26.025 73.15,24.525 77.7,24.525 78.55,25.375 78.55,26.225 80.6,26.225 81.837,24.987 79.825,22.975 72.15,22.975 72.15,23 69.95,25.2
  region net GND: 84.45,30.8 87.05,30.8 87.05,31.6 85.15,31.6 83.95,32.8 79.7,32.8 78.4,31.5 78.4,26.525 78.4,25 81.85,25 81.85,25.85 81.275,26.425 81.275,31.125 81.65,31.5 83.55,31.5 84.25,30.8
  region net GND: 71.35,29.6 72.25,29.6 72.25,30.4 71.35,30.4 70.9,30.85 67.7,30.85 67.25,30.4 66.35,30.4 66.35,29.6 67.25,29.6 67.55,29.3 71.05,29.3
  pour cut-out: 70.55,35.5 65.65,35.5 65.65,31.1 70.55,31.1
  region net $1N53: 69.2,34.55 70.7,34.55 70.7,33.725 71.425,33 75.65,33 76,33.35 76.8,33.35 76.8,32.275 77.85,31.225 77.85,30.65 75.175,30.65 74.925,30.4 74.925,29.05 73.3,29.05 73.3,30.375 72.075,31.6 71.425,31.6 70.975,32.05 69.2,32.05
  pour cut-out: 95.7,50.5 91.3,50.5 91.3,45.7 95.7,45.7
  region net Pow_IN: 104.1,38.5 107.4,38.5 107.4,36.5 102.2,31.3 102.2,30.8 96.7,30.8 96.4,31.1 96.4,36.2 101.8,36.2
  region net $1N509: 101,44.8 102.4,44.8 102.4,41.9 101.7,41.9 97.8,38 96.4,38 96.4,41 97.2,41
  region net $1N49: 121.4,20.9 120.4,21.9 117.6,21.9 115,19.3 106,19.3 105.4,18.7 105.4,17.9 106.4,16.9 120.4,16.9 121.4,17.9
  pour cut-out: 98.2,0.6 111.8,0.6 111.8,-4.7 98.2,-4.7

## Silkscreen, mask and mechanical layers (free items; w line width, h text height)
Top Silkscreen Layer:
  lines w0.254: 83.2,7.613 87.97,7.613 ; 83.2,10.153 87.97,10.153 ; 83.2,12.693 87.97,12.693 ; 83.2,15.233 87.97,15.233 ; 89.9,56.153 95.9,56.153 ; 89.9,58.693 95.9,58.693 ; 89.9,61.233 96,61.233 ; 93.12,7.624 97.89,7.624 ; 93.12,10.164 97.89,10.164 ; 93.12,12.704 97.89,12.704 ; 93.12,15.244 97.89,15.244 ; 101.1,56.153 105.87,56.153 ; 101.1,58.693 105.87,58.693 ; 101.1,61.233 105.87,61.233 ; 106,54.713 112.01,54.713 ; 106,57.253 112.01,57.253 ; 106.1,52.173 112.01,52.173 ; 106.1,59.793 112.01,59.793 ; 117.74,52.093 122.51,52.093 ; 117.74,54.633 122.51,54.633 ; 118,60.053 122.77,60.053 ; 118,62.593 122.77,62.593 ; 118,65.133 122.77,65.133 ; 118,70.553 122.77,70.553 ; 118,73.093 122.77,73.093 ; 118,75.633 122.77,75.633 ; 83.2,5.05 87.97,5.05 87.97,17.75 83.2,17.75 83.2,5.05 ; 89.9,53.6 95.97,53.6 95.97,63.75 89.9,63.75 89.9,53.6 ; 93.12,5.061 93.12,17.761 97.89,17.761 97.89,5.061 93.12,5.061 ; 101.1,53.6 101.1,63.75 105.87,63.75 105.87,53.6 101.1,53.6 ; 106,49.7 112.01,49.7 112.01,62.31 106,62.31 106,49.7 ; 117.74,49.6 122.51,49.6 122.51,57.15 117.74,57.15 117.74,49.6 ; 118,57.5 118,67.65 122.77,67.65 122.77,57.5 118,57.5 ; 118,68 122.77,68 122.77,78.15 118,78.15 118,68
  text "+5V" at 118.354,76.154 h1.52
  text "+5V" at 118.354,73.654 h1.52
  text "GND" at 118.354,71.054 h1.52
  text "GND" at 118.354,68.554 h1.52
  text "3V3" at 118.354,65.654 h1.52
  text "3V3" at 118.354,63.154 h1.52
  text "PG10" at 90.254,61.754 h1.52
  text "PE0" at 101.454,61.754 h1.52
  text "GND" at 118.354,60.554 h1.52
  text "C2|3" at 106.294,60.314 h1.52
  text "PG11" at 90.254,59.254 h1.52
  text "PE1" at 101.454,59.254 h1.52
  text "GND" at 118.354,58.054 h1.52
  text "MISO" at 106.294,57.814 h1.52
  text "PG12" at 90.254,56.654 h1.52
  text "PE2" at 101.454,56.654 h1.52
  text "MOSI" at 106.294,55.214 h1.52
  text "SDA" at 118.094,55.154 h1.52
  text "PG13" at 90.254,54.154 h1.52
  text "PE3" at 101.454,54.154 h1.52
  text "SCK" at 106.294,52.714 h1.52
  text "SCL" at 118.094,52.654 h1.52
  text "GND" at 106.294,50.174 h1.52
  text "GND" at 118.094,50.054 h1.52
  text "3V3" at 90.354,41.354 h1.52
  text "+5V" at 95.254,41.354 h1.52
  text "I2C_RES" at 26.2,37 h1.2
  text "RUN" at 20.354,30.154 h1.52
  text "PD3" at 20.454,24.354 h1.52
  text "PD4" at 20.454,18.554 h1.52
  text "GND" at 83.554,15.754 h1.52
  text "GND" at 93.474,15.765 h1.52
  text "CKL" at 83.554,13.254 h1.52
  text "TX" at 94.154,13.254 h1.52
  text "DIO" at 83.554,10.654 h1.52
  text "RX" at 94.254,10.654 h1.52
  text "3V3" at 83.554,8.154 h1.52
  text "3V3" at 93.474,8.165 h1.52
  text "NRS" at 83.554,5.554 h1.52
  text "X" at 95.054,5.554 h1.52
  text "+5V" at 70.554,4.646 h1.52 r270
  text "3V3" at 73.154,4.646 h1.52 r270
  text "DIO" at 75.654,4.646 h1.52 r270
  text "CLK" at 78.254,4.646 h1.52 r270
  text "GND" at 80.854,4.646 h1.52 r270
Top Solder Mask Layer:
  region: 105.5,26.4 105.5,28.5 109,32 109,33.5 110.1,34.6 120.5,34.6 121.5,33.6 121.5,32 120.5,31 115.5,31 110.9,26.4
Bottom Solder Mask Layer:
  lines w2.54: 115,86.1 89.988,86.1 88.5,87.588 88.5,94.8 90.2,96.5 91.4,96.5 98.9,96.5 106.4,96.5 113.9,96.5 119.5,96.5 132.7,83.3 132.7,31.5 127.702,26.502 118.9,26.502 ; 98.9,83 116.4,83 ; 98.9,83 116.4,83 ; 98.9,83 91.4,83 98.9,83 ; 116.4,83 122.25,88.85 116.4,83 ; 117.96,93.44 129.5,81.9 ; 117.96,93.44 91.4,93.44 117.96,93.44 ; 117.96,93.44 129.5,81.9 ; 129.5,81.9 129.5,41.97 129.5,81.9
Mechanical Layer:
  the board outline again, w0.5
Document Layer:
  circle w0.1: c129.977,5.028 r1.6
  circle w0.1: c129.977,95.028 r1.6
  circle w0.1: c4.977,5.028 r1.6
  circle w0.1: c4.977,95.028 r1.6
  lines w0.1: 4.977,6.628 4.977,5.028 6.577,5.028 ; 4.977,93.428 4.977,95.028 6.577,95.028 ; 128.377,5.028 129.977,5.028 129.977,6.628 ; 128.377,95.028 129.977,95.028 129.977,93.428

## Text inside footprints (layer, text, board x,y; h text height)
OLED_Switch: Document Layer "1" at 100.022,18.761 h0.51
XT60: Top Silkscreen Layer "+" at 121.09,17.947 h2.03 r270; Top Silkscreen Layer "-" at 121.344,28.996 h2.03 r270